# Altium PCB Linear Charger PCB.PcbDoc
Units mm, origin at the board's own origin, x right, y up, seen from the top; angles counter-clockwise.
Board outline 152.4 x 101.6 mm, 2 copper layers (Top Layer, Bottom Layer); 41 components, 34 nets, 164 pads, 2 vias.
Unrouted connection lines stored in the file: 102.
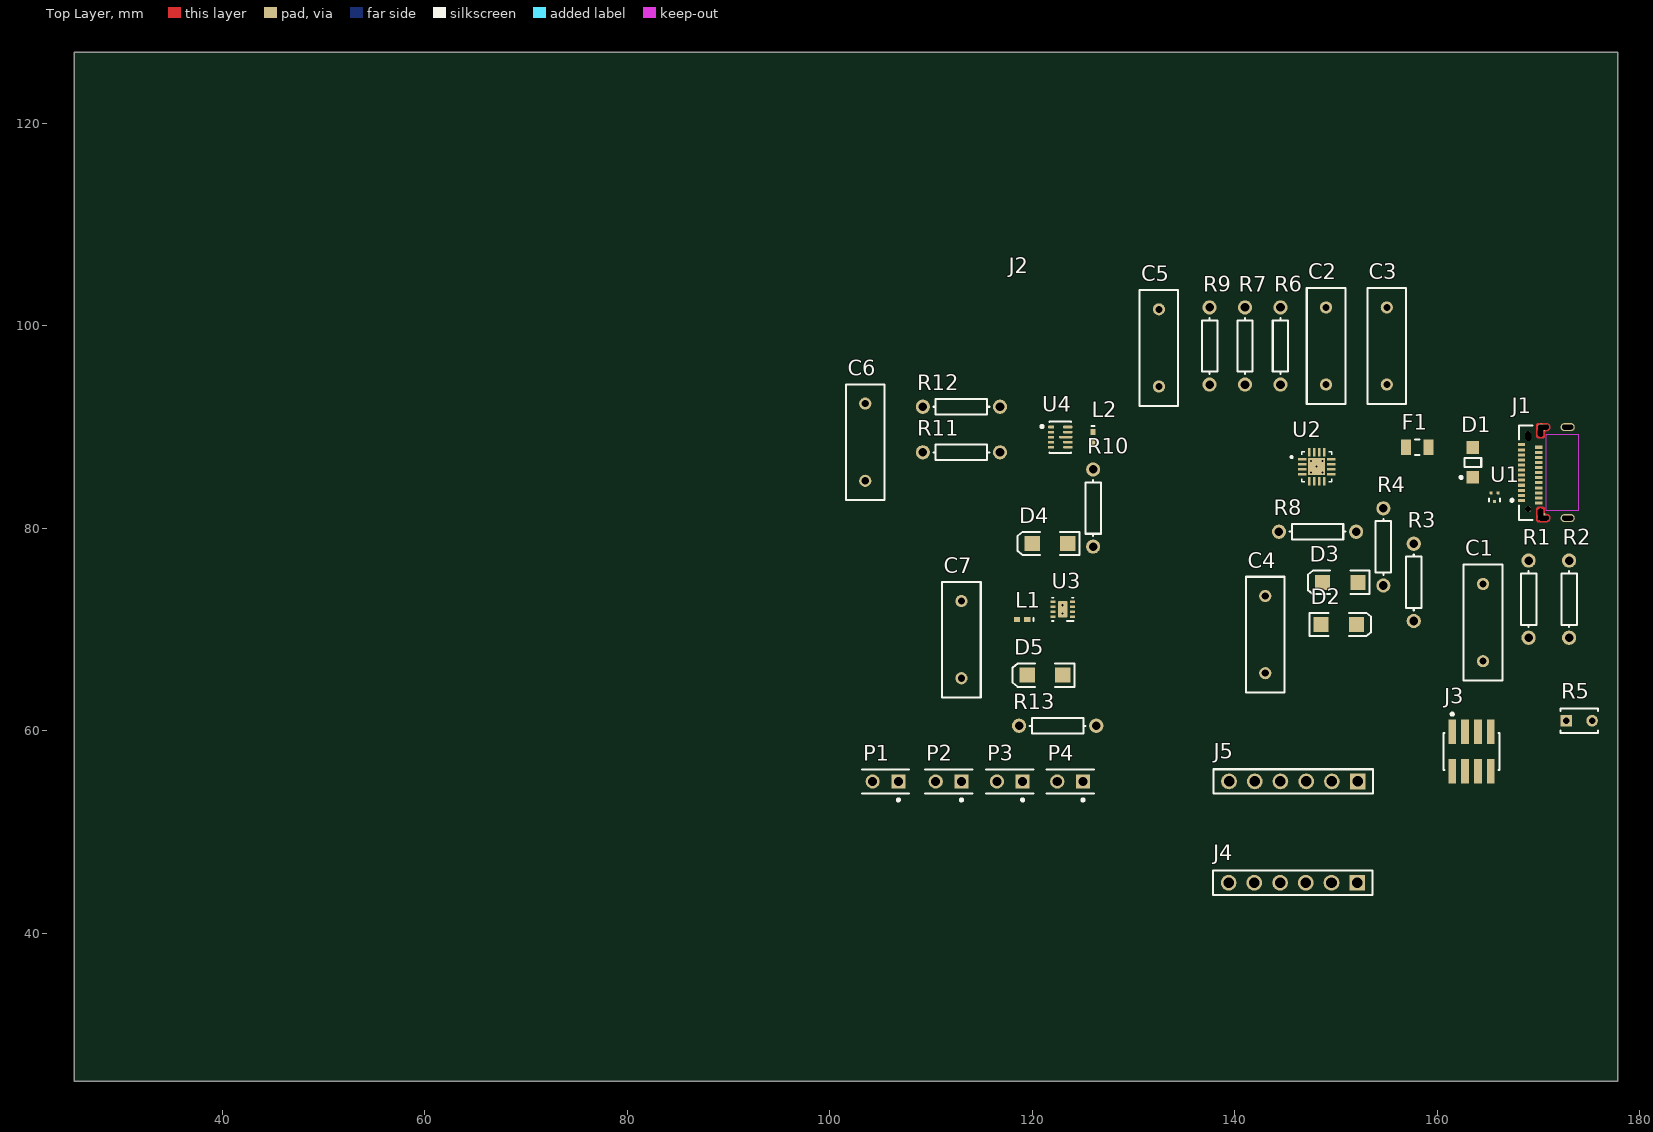
[diagram p0: Top Layer view]
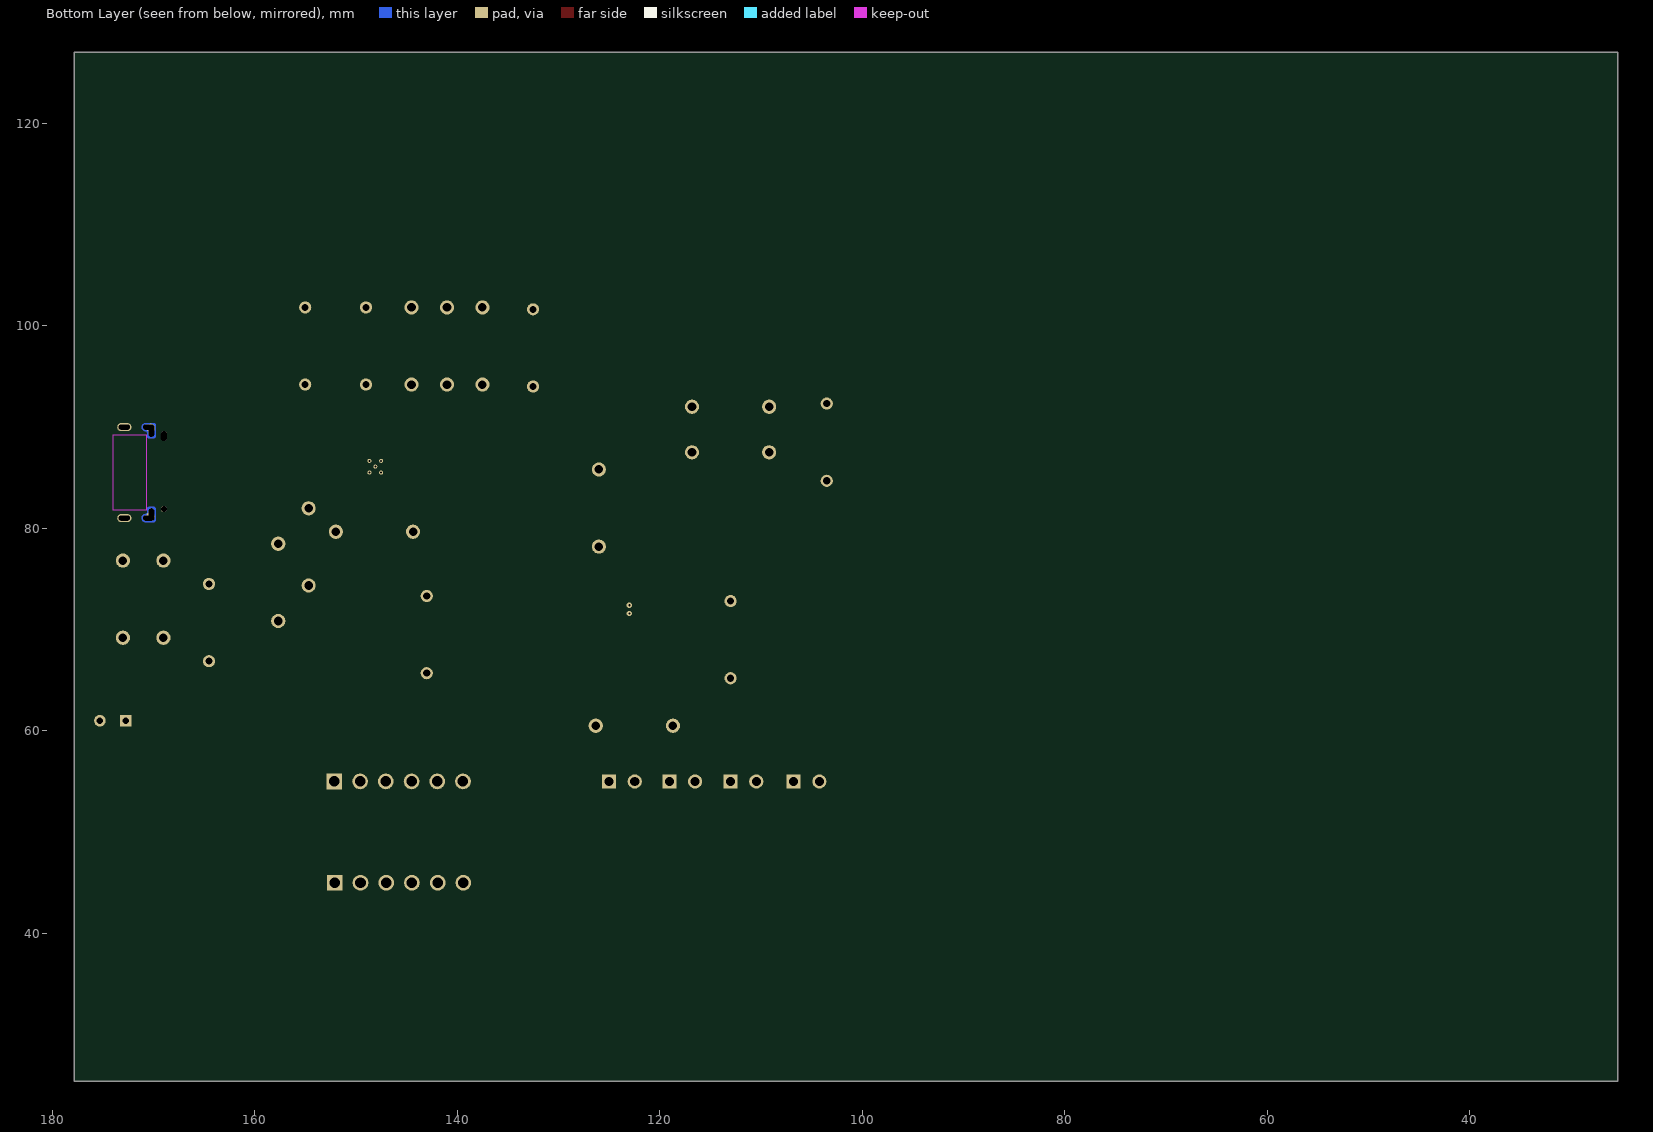
[diagram p1: Bottom Layer view, seen from below]

## Layer stack, top to bottom
Top Solder: solder mask 0.0102, Solder Resist, Dk 3.5
Top Layer: signal copper 0.0356
Dielectric 1: dielectric 0.32, FR-4, Dk 4.8
Bottom Layer: signal copper 0.0356
Bottom Solder: solder mask 0.0102, Solder Resist, Dk 3.5

## Board outline
25.4,25.4 177.8,25.4 177.8,127 25.4,127

## Design rules (kind name [scope] priority, off if disabled: settings)
Clearance [All] p1: gap=0.254 ignorepadtopadclearanceinfootprint=FALSE except(0: Arc-Hole Track-Hole SMDPad-Hole THPad-Hole Via-Hole Fill-Hole Poly-Hole Region-Hole Text-Hole)
PolygonConnect [All] p1: connectstyle=Relief reliefconductorwidth=0.254 reliefentries=4 polygonreliefangle="90 Angle" airgapwidth=0.254
RoutingVias [All] p1: holewidth=0.711 width=1.27 viastyle="Through Hole" minholewidth=0.711 minwidth=1.27 maxholewidth=0.711 maxwidth=1.27
SolderMaskExpansion [All] p1: expansion=0.102 istentingtop=FALSE
Width [All] p1: maxlimit=0.254 minlimit=0.254 preferedwidth=0.254
30 further rules are at their usual default settings.

## Components (designator, comment, footprint, x,y, rotation, side; value= is the part's Value field where it differs from the comment)
C1 "Cap" RAD-0.3 164.5,70.69 r90 top value=1uF
C2 "Cap" RAD-0.3 149,98 r270 top value=1uF
C3 "Cap" RAD-0.3 155,98 r270 top value=4.7uF
C4 "Cap" RAD-0.3 143,69.5 r270 top value=10uF
C5 "Cap" RAD-0.3 132.5,97.81 r90 top value=10uF
C6 "Cap" RAD-0.3 103.5,88.5 r270 top value=22uF
C7 "Cap" RAD-0.3 113,69 r270 top value=22uF
D1 "SMF5.0AT1G" ONSC-SOD-123FL-2-498_V 163.5,86.5 r90 top
D2 "LED2" 3.2X1.6X1.1 150.25,70.5 r0 top
D3 "LED2" 3.2X1.6X1.1 150.41,74.66 r180 top
D4 "LED2" 3.2X1.6X1.1 121.75,78.5 r180 top
D5 "LED2" 3.2X1.6X1.1 121.25,65.5 r180 top
F1 "0805L050WR" FP-0805L-MFG 158,88 r180 top value=0.15-0.85Ω
J1 "12401899E412A" FP-12401899E412A-MFG 172.885,85.5 r90 top
J2 "PHR-2" FP-PHR-2-MFG 120.5,102 r0 top
J3 "20021121-00008C4LF" FP-20021121-00008C4LF-MFG 163.365,57.95 r0 top
J4 "SSW-106-02-T-S" SMTC-SSW-106-02-X-S 152.08,45 r180 top
J5 "SSW-106-02-T-S" SMTC-SSW-106-02-X-S 152.12,55 r180 top
L1 "Inductor" 0402-A 119,71 r180 top value=2.2uH
L2 "Inductor" 0402-A 126,89 r270 top value=0.47uH
P1 "5-146280-2" TECO-5-146280-2_V 105.5,55 r180 top
P2 "5-146280-2" TECO-5-146280-2_V 111.73,55 r180 top
P3 "5-146280-2" TECO-5-146280-2_V 117.77,55 r180 top
P4 "5-146280-2" TECO-5-146280-2_V 123.73,55 r180 top
R1 "" AXIAL-0.3 169,73 r270 top value=5.1K
R2 "" AXIAL-0.3 173,73 r270 top value=5.1K
R3 "Res1" AXIAL-0.3 157.66,74.66 r90 top value=1K
R4 "Res1" AXIAL-0.3 154.66,78.16 r90 top value=1K
R5 "103AT-2" FP-103AT-2-MFG 174,61 r0 top
R6 "Res1" AXIAL-0.3 144.5,98 r270 top value=1.1K
R7 "Res1" AXIAL-0.3 141,98 r270 top value=56.25K
R8 "Res1" AXIAL-0.3 148.16,79.66 r180 top value=2.966K
R9 "Res1" AXIAL-0.3 137.5,98 r270 top value=890
R10 "Res1" AXIAL-0.3 126,82 r90 top value=180
R11 "Res1" AXIAL-0.3 113,87.5 r0 top value=66K
R12 "Res1" AXIAL-0.3 113,92 r180 top value=10K
R13 "Res1" AXIAL-0.3 122.5,60.5 r0 top value=260
U1 "TPD2EUSB30DRTR" DRT0003A 165.65,83.075 r270 top
U2 "BQ24074RGTR" QFN50P300X300X100-17N 148.08,86.08 r0 top
U3 "TPS62162DSGT" DSG0008A_V 123,72 r180 top
U4 "TPS63802DLAR" FP-DLA0010A-MFG 122.75,89 r0 top

## Footprints (in the part's own frame and the unit in brackets; to place one, negate y for a bottom-side part, rotate by r counter-clockwise, add the part's x,y. Pads: shape width x height; smd on the part's side, far side on the other; paste and mask are expansions set on the pad)
3.2X1.6X1.1 [mm] "SMT LED; 2 Flat Leads"
  rect 1.5x1.5 smd: 1(-1.75,0) 2(1.75,0)
  silkscreen extent -2.9,-1.15 3.2,1.15
0402-A [mm] "Chip Inductor, Body 1.0x0.5mm, IPC High Density"
  rect 0.6x0.5 smd: 1(-0.5,0) 2(0.5,0)
  silkscreen extent -1.1,-0.15 -1.1,0.15, body extent -0.55,-0.3 0.55,0.3, height 0.55
AXIAL-0.3 [mm] "Axial Device, Thru-Hole; 2 Leads; 0.3 in Pin Spacing"
  round 1.4 hole 0.85: 1(-3.81,0) 2(3.81,0)
  silkscreen extent -2.77,-0.76 2.77,0.76
DRT0003A [mm] "SOTFL, 3-Leads, Body 1x1mm (inc leads), Pitch 0.35mm"
  rrect33% 0.3x0.3 smd: 1(-0.425,0.35) 2(-0.425,-0.35) 3(0.425,0)
  silkscreen extent 0.13,-0.55 0.43,0.55, body extent -0.5,-0.5 0.5,0.5, height 0.5
DSG0008A_V [mm] "SON, 8-Leads, Body 2x2mm, Pitch 0.5mm, Thermal Pad 1.6x0.9mm, TI Recommended"
  rrect40% 0.5x0.25 smd: 1(-0.95,0.75) 2(-0.95,0.25) 3(-0.95,-0.25) 4(-0.95,-0.75) 5(0.95,-0.75) 6(0.95,-0.25) 7(0.95,0.25) 8(0.95,0.75)
  rrect11% 0.9x1.6 smd paste-0.45: 9(0,0)
  silkscreen extent -1.07,-1.15 1.07,1.15, body extent -1.05,-1.05 1.05,1.05, height 0.8
FP-103AT-2-MFG [mm]
  rect 1.15x1.15 hole 0.65 paste-1000 mask+0: 1(-1.27,0)
  round 1.15 hole 0.65 paste-1000 mask+0: 2(1.27,0)
  silkscreen extent -1.85,-1.2 1.85,1.2, body extent -1.95,-1.3 1.95,1.3, height 0.25
FP-0805L-MFG [mm]
  rect 1x1.5 smd paste+0 mask+0: 1(-1.1,0) 2(1.1,0)
  silkscreen extent -0.23,-0.75 0.23,0.75, body extent -1.7,-0.85 1.7,0.85, height 0.25
FP-12401899E412A-MFG [mm]
  rrect100% 0.5x1.1 hole 1.1 slot 0.5 at 0 deg paste-1000 mask+0: 1(-4.49,2.425) 2(4.49,2.425)
  round 0.877 smd paste-1000 mask+0: 1(-4.365,2.6)
  round 0.877 smd far side paste-1000 mask+0: 1(-4.365,2.6)
  rrect100% 1.2x0.55 hole 1.2 slot 0.55 at 90 deg paste-1000 mask+0: 1(-4.14,2.7) 2(4.14,2.7)
  round 0.866 smd paste-1000 mask+0: 2(4.396,2.644)
  round 0.866 smd far side paste-1000 mask+0: 2(4.396,2.644)
  rrect100% 0.8x1.4 hole 1.1 slot 0.5 at 0 deg paste-1000 mask+0: 3(-4.49,0.025) 4(4.49,0.025)
  rect 0.3x0.7 smd paste+0 mask+0: A1(-2.75,4.585) A2(-2.25,4.585) A3(-1.75,4.585) A4(-1.25,4.585) A5(-0.75,4.585) A6(-0.25,4.585) A7(0.25,4.585) A8(0.75,4.585) A9(1.25,4.585) A10(1.75,4.585) A11(2.25,4.585) A12(2.75,4.585) B1(2.5,2.885) B2(2,2.885) B3(1.5,2.885) B4(1,2.885) B5(0.5,2.885) B6(0,2.885) B7(-0.5,2.885) B8(-1,2.885) B9(-1.5,2.885) B10(-2,2.885) B11(-2.5,2.885) B12(-3,2.885)
  round 0.6 hole 0.6 unplated paste-1000 mask+0: ""(-3.6,3.925)
  rrect100% 0.95x0.6 hole 0.95 slot 0.6 at 90 deg unplated paste-1000 mask+0: ""(3.6,3.925)
  Top Layer region: 4.89,2.125 4.836,1.925 4.69,1.779 4.49,1.725 4.49,1.725 4.337,1.755 4.207,1.842 4.12,1.972 4.09,2.125 4.09,2.125 4.072,2.197 4.021,2.252 3.95,2.275 3.95,2.275 3.59,2.275 3.513,2.29 3.449,2.334 3.405,2.398 3.39,2.475 3.39,2.475 3.39,2.925 3.417,3.025 3.49,3.098 3.59,3.125 3.59,3.125 4.69,3.125 4.79,3.098 4.863,3.025 4.89,2.925 4.89,2.925 4.89,2.925
  Top Layer region: -4.89,2.425 -4.89,2.125 -4.836,1.925 -4.69,1.779 -4.49,1.725 -4.49,1.725 -4.337,1.755 -4.207,1.842 -4.12,1.972 -4.09,2.125 -4.09,2.125 -4.072,2.197 -4.021,2.252 -3.95,2.275 -3.95,2.275 -3.59,2.275 -3.513,2.29 -3.449,2.334 -3.405,2.398 -3.39,2.475 -3.39,2.475 -3.39,2.925 -3.417,3.025 -3.49,3.098 -3.59,3.125 -3.59,3.125 -4.69,3.125 -4.79,3.098 -4.863,3.025 -4.89,2.925 -4.89,2.925
  Bottom Layer region: 4.89,2.125 4.836,1.925 4.69,1.779 4.49,1.725 4.49,1.725 4.337,1.755 4.207,1.842 4.12,1.972 4.09,2.125 4.09,2.125 4.072,2.197 4.021,2.252 3.95,2.275 3.95,2.275 3.59,2.275 3.513,2.29 3.449,2.334 3.405,2.398 3.39,2.475 3.39,2.475 3.39,2.925 3.417,3.025 3.49,3.098 3.59,3.125 3.59,3.125 4.69,3.125 4.79,3.098 4.863,3.025 4.89,2.925 4.89,2.925 4.89,2.925
  Bottom Layer region: -4.89,2.125 -4.836,1.925 -4.69,1.779 -4.49,1.725 -4.49,1.725 -4.337,1.755 -4.207,1.842 -4.12,1.972 -4.09,2.125 -4.09,2.125 -4.072,2.197 -4.021,2.252 -3.95,2.275 -3.95,2.275 -3.59,2.275 -3.513,2.29 -3.449,2.334 -3.405,2.398 -3.39,2.475 -3.39,2.475 -3.39,2.925 -3.417,3.025 -3.49,3.098 -3.59,3.125 -3.59,3.125 -4.69,3.125 -4.79,3.098 -4.863,3.025 -4.89,2.925 -4.89,2.925 -4.89,2.925
  Keep-Out Layer region: -3.74,-1.075 3.74,-1.075 3.74,2.185 -3.74,2.185
  silkscreen extent -4.66,3.5 4.66,5.65, body extent -4.99,-4.95 4.99,5.03, height 0.25
FP-20021121-00008C4LF-MFG [mm]
  rect 0.76x2.4 smd paste+0 mask+0: 1(-1.905,1.95) 2(-1.905,-1.95) 3(-0.635,1.95) 4(-0.635,-1.95) 5(0.635,1.95) 6(0.635,-1.95) 7(1.905,1.95) 8(1.905,-1.95)
  silkscreen extent -2.77,-1.82 2.77,3.82, body extent -2.87,-3.25 2.87,3.25, height 0.25
FP-DLA0010A-MFG [mm]
  rrect40% 0.6x0.25 smd paste+0 mask+0: 1(-0.9,1) 2(-0.9,0.5) 3(-0.9,0) 4(-0.9,-0.5) 5(-0.9,-1)
  rrect40% 0.9x0.25 smd paste+0 mask+0: 6(0.75,-1) 7(0.75,-0.5) 9(0.75,0.5) 10(0.75,1)
  rrect40% 1.3x0.25 smd paste-1000 mask+0: 8(0.55,0)
  silkscreen extent -1.92,-1.55 1.05,1.55, body extent -1.3,-1.65 1.3,1.65, height 0.25
FP-PHR-2-MFG [mm]
  body extent -3,-2.35 3,2.35, height 0.25
ONSC-SOD-123FL-2-498_V [mm] "SOD, 2-Leads, Body 2.7x1.65mm"
  rect 1.25x1.22 smd: 1(-1.475,0) 2(1.475,0)
  silkscreen extent -1.6,-0.82 0.45,1.28, body extent -1.35,-0.82 1.35,0.82, height 0.98
QFN50P300X300X100-17N [mm]
  rrect25% 0.86x0.26 smd: 1(-1.435,0.75) 2(-1.435,0.25) 3(-1.435,-0.25) 4(-1.435,-0.75) 9(1.435,-0.75) 10(1.435,-0.25) 11(1.435,0.25) 12(1.435,0.75)
  rrect25% 0.26x0.86 smd: 5(-0.75,-1.435) 6(-0.25,-1.435) 7(0.25,-1.435) 8(0.75,-1.435) 13(0.75,1.435) 14(0.25,1.435) 15(-0.25,1.435) 16(-0.75,1.435)
  rect 1.68x1.68 smd paste-0.31: 17(0,0)
  round 0.4 hole 0.2 mask+0: 18(0,0) 19(-0.58,0.58) 20(0.58,0.58) 21(-0.58,-0.58) 22(0.58,-0.58)
  silkscreen extent -2.57,-1.5 1.5,1.5, body extent -1.5,-1.5 1.5,1.5, height 1
RAD-0.3 [mm] "Radial Cap, Thru-Hole; 2 Leads; 0.3 in Pin Spacing"
  round 1.2 hole 0.7: 1(-3.81,0) 2(3.81,0)
  silkscreen extent -5.71,-1.91 5.71,1.91
SMTC-SSW-106-02-X-S [mm] "SQ Post Socket, 1x6 Pins, Vertical, 2.54mm Pitch, Female"
  rect 1.55x1.55 hole 1.04: 1(0,0)
  round 1.55 hole 1.04: 2(2.54,0) 3(5.08,0) 4(7.62,0) 5(10.16,0) 6(12.7,0)
  silkscreen extent -1.53,-1.2 14.23,1.2, body extent -1.52,-1.21 14.22,1.21, height 8.51
TECO-5-146280-2_V [mm] "Connector, 2-Leads, Body 4.67x2.34mm, Pitch 2.54mm"
  rect 1.4x1.4 hole 0.89: 1(-1.27,0)
  round 1.4 hole 0.89: 2(1.27,0)
  silkscreen extent -2.33,-1.17 2.33,1.94, body extent -2.34,-1.17 2.34,1.17, height 5.33

## Part data
C1 C2 C3 C4 C5 C6 C7: "Capacitor", LatestRevisionDate=17-Jul-2002, LatestRevisionNote="Re-released for DXP Platform.", PackageDescription="Radial Cap, Thru-Hole; 2 Leads; 0.3 in Pin Spacing", PackageReference=RAD-0.3, Published=8-Jun-2000, Publisher="Altium Limited"
D1: library part CMP-1061-00612-1, "200 W Transient Voltage Suppressor, 2-Pin SOD-123FL, Pb-Free, Tape and Reel", Manufacturer="On Semiconductor", ComponentLink1Description="Manufacturer URL", ComponentLink1URL=http://www.onsemi.com/, ComponentLink2Description=Datasheet, ComponentLink2URL=http://www.onsemi.com/pub_link/Collateral/SMF5.0AT1-D.PDF, ComponentLink3Description="Package Specification", ComponentLink3URL=http://www.onsemi.com/pub_link/Collateral/498-01.PDF, DatasheetVersion="Rev. 7", Direction=Unidirectional, IR Max (uA)=400, Mounting Technology="Surface Mount", PackageDescription="2-Pin SOD, Body 1.65 x 2.7 mm", PackageReference=SOD-123FL-2-498, PackageVersion="Rev. D, 05/2013", Packing="Tape and Reel", PartNumber=SMF5.0AT1G, RoHS=Pb-Free, V(BR) Typ (V)=6.7
D2 D3 D4 D5: "Typical RED, GREEN, YELLOW, AMBER GaAs LED", LatestRevisionDate=17-Jul-2002, LatestRevisionNote="Re-released for DXP Platform.", PackageDescription="SM LED; 2 Flat Leads", PackageReference=3.2X1.6X1.1, PackageVersion=Feb-2002, Published=8-Jun-2000, Publisher="Altium Limited"
F1: library part CMP-08606-000023-1, "PTC RESET FUSE 6V 500MA 0805", Ambient Temperature Range High=+85°C, Ambient Temperature Range Low=-40°C, Current Rating=100A, Hold Current=0.5A, Manufacturer="Littelfuse Inc.", Package=0805L, Resistance=0.15-0.85Ω, Temperature="-40°C to +85°C", Trip Current=1A, Voltage Rating=6V, Automotive=No, Category=Fuse, ComponentLink2Description=Datasheet, ComponentLink2URL=https://www.littelfuse.com/~/media/electronics/datasheets/resettable_ptcs/littelfuse_ptc_0805l_datasheet.pdf.pdf, Device Class L1="Circuit Protection", Device Class L2="PTC Resettable Fuses", Device Class L3=unset, Digikey Description="PTC RESET FUSE 6V 500MA 0805", Height=1.25mm, Lead Free=Yes, Manufacturer Part Number=0805L050WR, Mouser Description="PTC Resettable Fuse 0.5A(hold) 1A(trip) 6VDC 100A 0.5W 0.1s 0.15Ohm SMD Solder Pad 0805 T/R", Octopart=https://octopart.com/0805l050wr-littelfuse-673858, RoHS=TRUE, Temperature Range High=+85°C, Temperature Range Low=-40°C, Trip Time=0.1s
J1: library part CMP-02355-000006-1, "USB TYPE C, RECEPTACLE, TOP MOUN"
J2: library part CMP-17439-000064-1, "CONN HOUSING PH 2POS 2MM WHITE", Color=Natural, Contact Resistance=10mR, Current Rating=2A, Flammability Rating="UL94 V-0", Housing Color=White, Insulation Resistance=1GR, Max Operating Temperature=85°C, Max Voltage Rating (AC)=100V, Min Operating Temperature=-25°C, Connector Type=Receptacle, Contact Material=Bronze, Contact Plating=Tin, Contact Type="Female Socket", Depth=6.85mm, Fastening Type=Detent, Gender=Female, Height=6.4mm, Housing Material=Polyamide, Lead Free="Lead Free", Length=5.8mm, Material=Nylon, Max Current Rating=2A, Mount="Free Hanging", Number of Contacts=2, Number of Pins=2, Number of Positions=2, Number of Rows=1, Orientation=Straight, Packaging=Bulk, Pitch=2mm, REACH SVHC="No SVHC", Series=PH, Termination=Crimp, Weight=0.0625lb, Width=4.5mm, Wire Gauge (Max)=30AWG, Wire Gauge (Min)=24AWG, Working Voltage=100V
J3: library part CMP-15126-126517167-1, "20021121-00008C4LF Conn Unshrouded Header HDR 8 POS 1.27mm Solder ST Top Entry SMD Minitek127® T/R", Color=Black, Contact Resistance=30mΩ, Current Rating=1A, Max Operating Temperature=85°C, Max Voltage Rating (AC)=125V, Min Operating Temperature=-55°C, Connector Type="Header, Male Pin", Contact Material=Copper, Contact Mating Length=3.048mm, Contact Plating=Gold, Depth=3.4mm, Gender=Male, Height=5.05mm, Housing Color=Black, Housing Material=Thermoplastic, Length=5.08mm, Mating Post Length=3.05mm, Mount="Surface Mount", NexarPartId=126517167, Number of Contacts=8, Number of Pins=8, Number of Positions=8, Number of Rows=2, Orientation=Straight, Pitch=1.27mm, REACH SVHC="No SVHC", RoHS=Compliant, Row Spacing=1.27mm, Stack Height=3mm, Termination=Solder, Voltage Rating=125V
J4 J5: library part CMP-1023-00360-1, "SQ Post Socket, Through-hole, Vertical, -55 to 105 degC, 2.54mm Pitch, 6-Pin, Female, RoHS", Manufacturer=Samtec, Temperature Range="-55 to 105 degC", ComponentLink1Description="Manufacturer URL", ComponentLink1URL=http://www.samtec.com, ComponentLink2Description=Datasheet, ComponentLink2URL=http://www.samtec.com/documents/webfiles/pdf/SSW_TH.PDF, ComponentLink3Description="Package Specification", ComponentLink3URL=http://www.samtec.com/documents/webfiles/cpdf/SSW-1XX-XX-XXX-X-XX-XXX-XX-MKT.pdf, DatasheetVersion=F-214, Mounting Technology=Through-hole, Orientation=Vertical, PackageDescription="Assembly, Socket Strip .016 X .031 Tail", PackageReference=SSW-106-02-X-S, PackageVersion="CA, 6/1987", PartNumber=SSW-106-02-T-S, Pitch="2.54 mm", RoHS=True
P1 P2 P3 P4: library part CMP-2000-07492-1, "Male Header, Pitch 2.54 mm, 1 x 2 Position, Height 8.21 mm, Tail Length 3.05 mm, -65 to 105 degC, RoHS, Bulk", Case\/Package=100, Colour=Black, Current Rating=3A, Flammability Rating=UL94V-0, High Temperature Housing=Yes, Manufacturer="TE Connectivity", Max Current Rating=5A, Max Operating Temperature=105degC, Min Operating Temperature=-65degC, Package Description="Male Header, Pitch 2.54 mm, 1 x 2 Position, Height 8.21 mm, Tail Length 3.05 mm", Package Quantity=500, Approvals=CSA, Board Standoff=No(Without), Connector Type=Header, Contact Gender=Male, Contact Material=CopperAlloy, Contact Mating Length=0.23inch, Contact Plating=Matte, Contact Protection=No(Without), Contact Shape=Square, Datasheet URL=http://www.te.com/commerce/DocumentDelivery/DDEController?Action=showdoc&DocId=Customer+Drawing%7F146280%7FH1%7Fpdf%7FEnglish%7FENG_CD_146280_H1.pdf%7F5-146280-2, Datasheet Version="Rev. H1, 08/2016", Depth=2.34mm, Gasket=No(Without), High Speed Serial Data Connector=No, Housing Colour=Black, Housing Material=Polymer, Keyed=No, Length=4.67mm, Manufacturer URL=http://www.te.com/, Mating Alignment=No(Without), Mating Connector Lock=No(Without), Mating Post Length=0.23inch, Mount=ThroughHole, Mounting Technology=ThroughHole, Number of Contacts=2, Number of Positions=2, Number of Rows=1, Orientation=Straight, Package Reference=5-146280-2, Packaging=Carton, Panel Mount Retention=No(Without), PCB Mount Retention=Without, PCB Mounting Orientation=Vertical, PCB Thickness=0.063inch, Pitch=2.54mm, Radiation Hardening=No, RoHSCompliant=true, Row Spacing=2.54mm, Selectively Loaded=No(Without), Stabilizers=No(Without), Termination=ThroughHole, Termination Post Length=0.12inch
R1 R2: library part Res1, "Resistor", LatestRevisionDate=17-Jul-2002, LatestRevisionNote="Re-released for DXP Platform.", PackageDescription="Axial Device, Thru-Hole; 2 Leads; 0.3 in Pin Spacing", PackageReference=AXIAL-0.3, Published=8-Jun-2000, Publisher="Altium Limited"
R3 R4 R6 R7 R8 R9 R10 R11 R12 R13: "Resistor", LatestRevisionDate=17-Jul-2002, LatestRevisionNote="Re-released for DXP Platform.", PackageDescription="Axial Device, Thru-Hole; 2 Leads; 0.3 in Pin Spacing", PackageReference=AXIAL-0.3, Published=8-Jun-2000, Publisher="Altium Limited"
R5: library part CMP-2000-05824-2, "Thermistor NTC 10KOhm 1% 2-Pin", Max Operating Temperature=110°C, Min Operating Temperature=-50°C, Resistance=10kR, Tolerance=1%, Height=2.4mm, Lead Pitch=2.54mm, Length=17mm, Number of Pins=2, Packaging=Bulk, RoHS Compliant=Yes, Series=AT, Termination=Radial, Width=3.7mm
U1: library part CMP-0326-00046-3, "ESD Solution for Super-Speed (6 Gbps) USB 3.0 Interface, 2 Channels, -40 to +85 degC, 3-pin SOT (DRT), Green (Rohs & No Sb/Br)", Breakdown Voltage(Min)(V)=9, Differential Capacitance(pF)=0.01, IO Capacitance(Typ)(pF)=0.7, IO Leakage Current(nA)=10, Manufacturer="Texas Instruments", 1394 / Firewire=TRUE, ComponentLink1Description=Datasheet, ComponentLink1URL=http://www.ti.com/general/docs/lit/getliterature.tsp?genericPartNumber=TPD2EUSB30&fileType=pdf, ComponentLink2Description="URL Link1", ComponentLink2URL=SamplesURL:http://www.ti.com/product/tpd2eusb30#samples, DatasheetVersion=SLVSAC2C, Eco-Plan="Green (RoHS & no Sb/Br)", HDMI=TRUE, IEC 61000-4-2 Air-Gap(+/- kV)=8, IEC 61000-4-2 Contact(+/- kV)=8, Mounting Technology="Surface Mount", PackageDescription="3-Flat Lead Plastic Small Outline, 1 x 1 mm (inc leads), 0.35 mm Pitch", PackageReference=DRT0003A, PackageVersion="revD, Jun-2008", PartNumber=TPD2EUSB30DRTR, Serial ATA / eSATA=TRUE, SubFamily="ESD Solution", USB Full Speed=TRUE, USB High Speed=TRUE, USB Super Speed=TRUE
U2: "Standalone 1-cell 1.5-A linear battery charger, Power Path, 4.2-V VBAT, 10.5-V OVP and 4.4-V VOUT", Package="VQFN-16 Texas Instruments", Check_prices=https://www.snapeda.com/parts/BQ24074RGTR/Texas+Instruments/view-part/?ref=eda, MF="Texas Instruments", MP=BQ24074RGTR, SnapEDA_Link=https://www.snapeda.com/parts/BQ24074RGTR/Texas+Instruments/view-part/?ref=snap
U3: library part CMP-0323-00319-3, "Buck Step Down Regulator with 3 to 17 V Input and 3.3 V Output, -40 to 85 degC, 8-Pin WSON (DSG), Green (RoHS & no Sb/Br)", Manufacturer="Texas Instruments", Rating=Catalog, Switch Current Limit(Typ)(A)=1.8, Code_JEDEC=MO-229, ComponentLink1Description=Datasheet, ComponentLink1URL=http://www.ti.com/general/docs/lit/getliterature.tsp?genericPartNumber=TPS62162&fileType=pdf, ComponentLink2Description="Package Specification", ComponentLink2URL=http://www.ti.com/litv/pdf/mpds308a, ComponentLink3Description="URL Link1", ComponentLink3URL="Samples URL:http://www.ti.com/product/tps54611#samples", DatasheetVersion=SLVSAM2A, Duty Cycle(Max)(%)=100, Eco-Plan="Green (RoHS & no Sb/Br)", Iout(Max)(A)=1, Iq(Typ)(mA)=0.017, Mounting Technology="Surface Mount", PackageDescription="8-Pin Plastic Small Outline No-Lead, 2 x 2 x 0.8 mm Body, 0.5 mm Pitch, Exposed Pad", PackageReference=DSG0008A, PackageVersion="revB, Oct-2010", PartNumber=TPS62162DSGT, Preset Vout(V)=3.3, Regulated Outputs(#)=1, SubFamily="Step-Down Regulator", Synchronous Rectification=TRUE, Topology=Buck, Vin(Max)(V)=17, Vin(Min)(V)=3, Vout(Max)(V)=3.3, Vout(Min)(V)=3.3
U4: library part CMP-04918-000005-1, "IC POWER MANAGEMENT", Manufacturer="Texas Instruments", Max Junction Temp=+125°C, Max Supply Voltage=5.5V, Min Supply Voltage=1.3V, Nominal Supply Current=11uA, Output Current=2A, Output Voltage=1.8-5.2V, Package=DLA0010A, Switching Frequency=1.4/1.6/2.1MHz, Temperature="-40°C to +125°C", Temperature Range Low=-40°C, Automotive=No, Category=IC, ComponentLink2Description=Datasheet, ComponentLink2URL=https://www.ti.com/lit/ds/symlink/tps63802.pdf, Device Class L1="Integrated Circuits (ICs)", Device Class L2="Power Management ICs", Device Class L3="Voltage Regulators - Switching", Digikey Description="IC POWER MANAGEMENT", Height=1mm, Lead Free=Yes, Manufacturer Part Number=TPS63802DLAR, Max Duty Cycle=100%, Mouser Description="2-A, high-efficient, 11-µA quiescent current buck-boost converter in QFN/DFN package 10-VSON-HR -40 to 125", Number Of Outputs=1, Octopart=https://octopart.com/tps63802dlar-texas+instruments-97359678, Output Type=AdjustableProgrammable, RoHS=TRUE, Standoff Height=0mm, Switching Topology=Buck-Boost, Temperature Range High=+125°C
L1 L2: Code_IEC=1005, Code_JEITA=0402, LatestRevisionDate=29-May-2009, LatestRevisionNote="IPC-7351 Footprint Added.", PackageDescription="Chip Inductor", PackageReference=0402-A, Published=8-Jun-2000, Publisher="Altium Limited"

## Via types
v1: diameter 0.5, hole 0.2, Top Layer to Bottom Layer, 2 vias

## Nets (pads, with @x,y where several pads share a name; then routed paths per layer and width w, separated by ;. In a path a pad name is that pad's centre, name@x,y a point inside that pad or via, vN(x,y) a via of type N, cw(c..) or ccw(c..) an arc to the next point about the centre after c; other vN are vias at no path point)
3V3: C7.2 J4.6 J5.6 L1.2 P2.2 P3.2 P4.2 R13.1 U3.6
3V8: C6.2 P1.2 R10.2 R11.1 U4.6
BATT: C2.2 U2.2 U2.3
CC1: J1.A5 R2.1
CC2: J1.B5 R1.1
CHG_OUT: C3.2 C4.1 C5.1 R3.2 R4.2 U2.10 U2.11 U3.2 U3.3 U4.1 U4.10
GND: C1.1 C2.1 C3.1 C4.2 C5.2 C6.1 C7.1 D1.2 J1.1 J1.2 J1.3 J1.4 J1.A1 J1.A12 J1.B1 J1.B12 J4.4 J5.5 P1.1 P2.1 P3.1 P4.1 R1.2 R2.2 R5.2 R6.1 R7.1 R8.1 R9.1 R12.2 U1.3 U2.8 U2.17 U3.1 U3.4 U3.5 U3.9 U4.2 U4.3 U4.8
  other v1: 123,71.6 123,72.4
IMU_INT: J3.8 J4.1
IMU_SCL: J3.4 J4.3
IMU_SDA: J3.6 J4.2
NetD2_1: D2.1 R3.1
NetD2_2: D2.2 U2.9
NetD3_1: D3.1 R4.1
NetD3_2: D3.2 U2.7
NetD4_1: D4.1 R10.1
NetD4_2: D4.2 U4.5
NetD5_1: D5.1 R13.2
NetD5_2: D5.2 U3.8
NetJ3_3: J3.3 U2.4
NetJ3_5: J3.5 U2.6
NetJ3_7: J3.7 U2.5
NetL1_1: L1.1 U3.7
NetL2_1: L2.1 U4.9
NetL2_2: L2.2 U4.7
NetR5_1: R5.1 U2.1
NetR6_2: R6.2 U2.12
NetR7_2: R7.2 U2.14
NetR8_2: R8.2 U2.15
NetR9_2: R9.2 U2.16
NetR11_2: R11.2 R12.1 U4.4
USB_5V: C1.2 F1.2 U2.13
USB_D+: J1.A6 J1.B6 J3.1 U1.1
USB_D-: J1.A7 J1.B7 J3.2 U1.2
VBUS: D1.1 F1.1 J1.A4 J1.A9 J1.B4 J1.B9
pads on no net: J1. J1.A2 J1.A3 J1.A8 J1.A10 J1.A11 J1.B2 J1.B3 J1.B8 J1.B10 J1.B11 J4.5 J5.1 J5.2 J5.3 J5.4 U2.18 U2.19 U2.20 U2.21 U2.22